# Altium PCB Mini_FPGA_Calculator.PcbDoc
Units mil, origin at the board's own origin, x right, y up, seen from the top; angles counter-clockwise.
Board outline 6000 x 4000 mil, 2 copper layers (Top Layer, Bottom Layer); 45 components, 44 nets, 391 pads, 0 vias.
Unrouted connection lines stored in the file: 67.
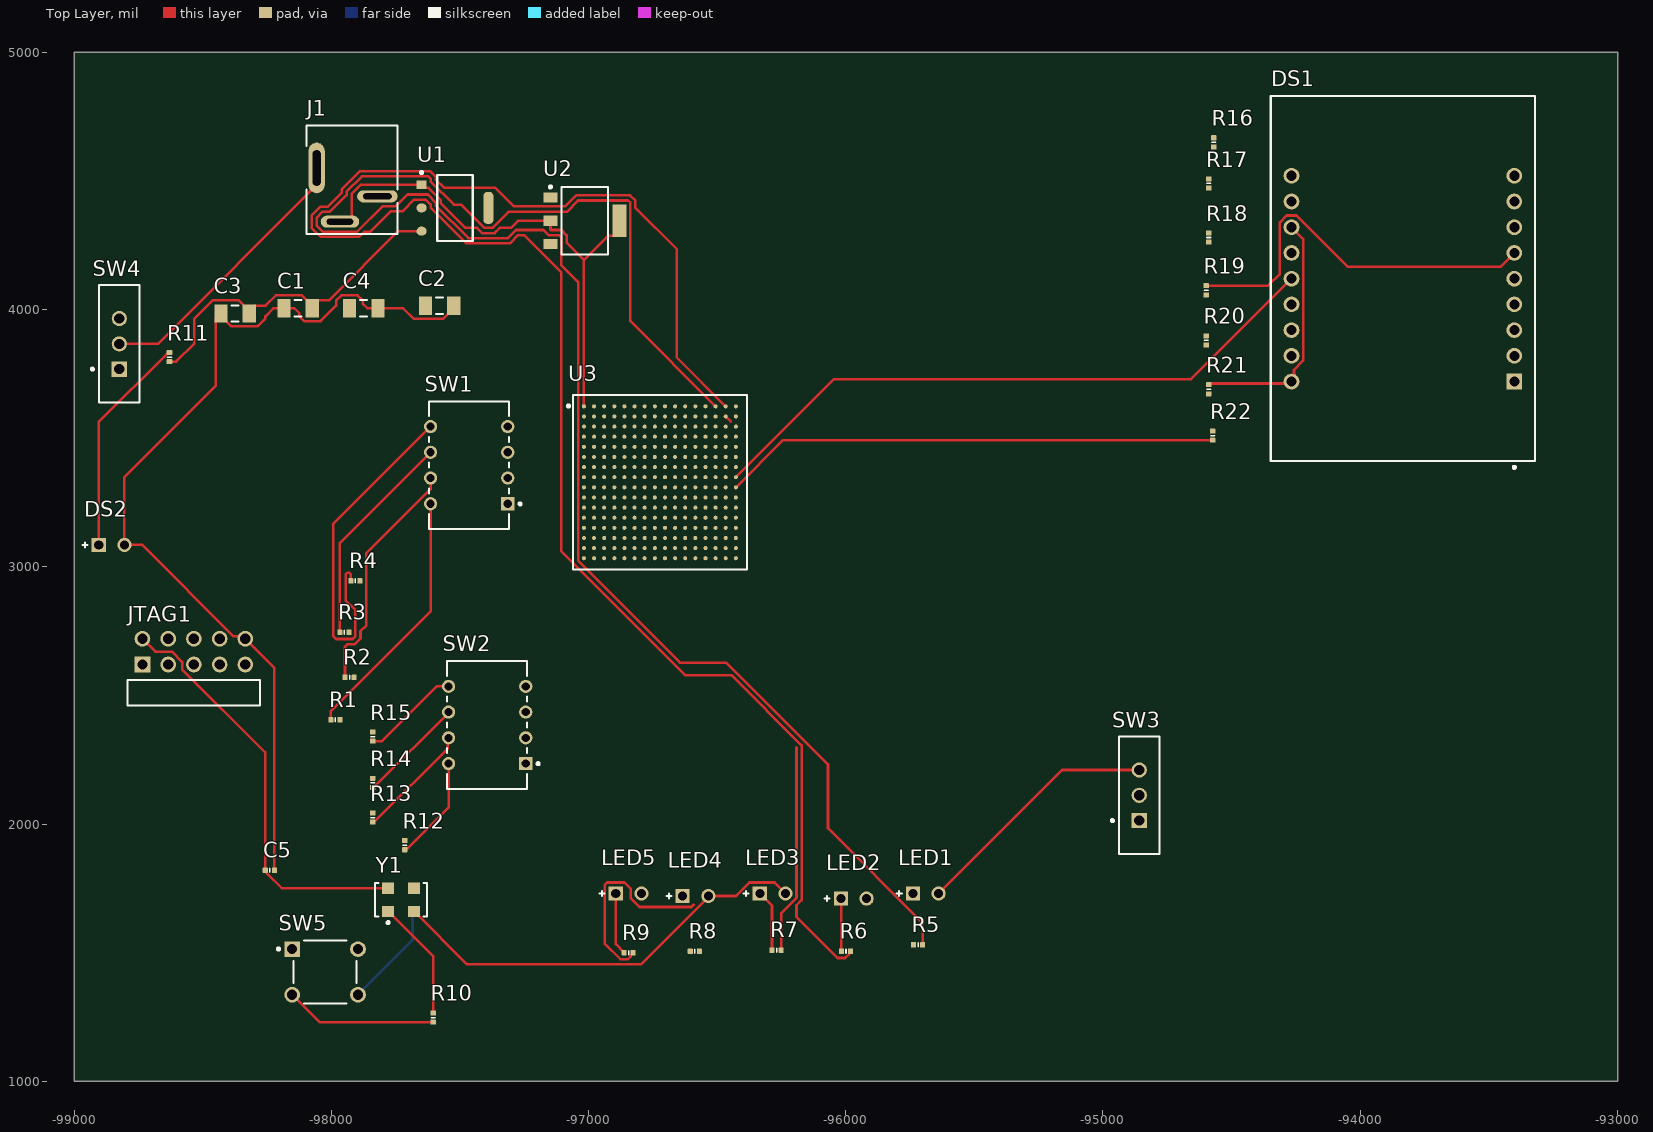
[diagram p0: Top Layer view]
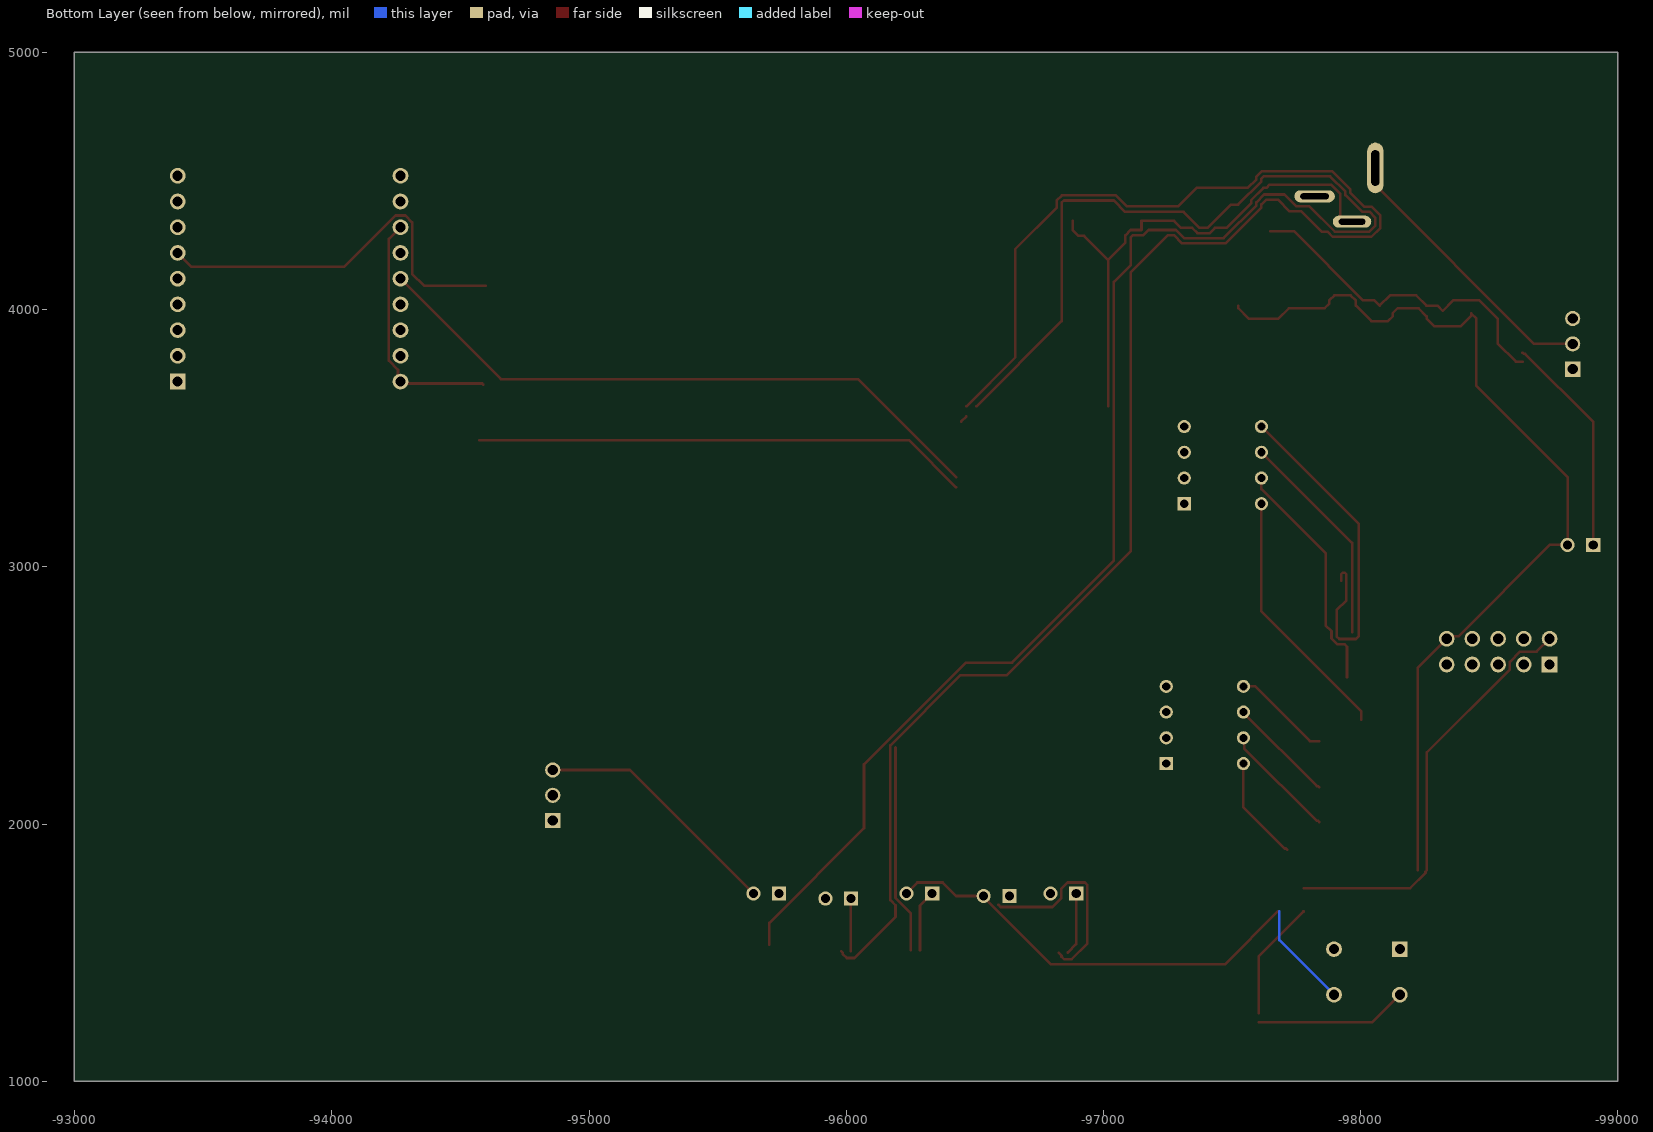
[diagram p1: Bottom Layer view, seen from below]

## Layer stack, top to bottom
Top Solder: solder mask 0.4, Solder Resist, Dk 3.5
Top Layer: signal copper 1.4
Dielectric 1: dielectric 12.6, FR-4, Dk 4.8
Bottom Layer: signal copper 1.4
Bottom Solder: solder mask 0.4, Solder Resist, Dk 3.5

## Board outline
-98999,1000 -92999,1000 -92999,5000 -98999,5000

## Design rules (kind name [scope] priority, off if disabled: settings)
Clearance [All] p1: gap=10 ignorepadtopadclearanceinfootprint=FALSE
PolygonConnect [All] p1: connectstyle=Relief reliefconductorwidth=10 reliefentries=4 polygonreliefangle="90 Angle" airgapwidth=10
RoutingVias [All] p1: holewidth=28 width=50 viastyle="Through Hole" minholewidth=28 minwidth=50 maxholewidth=28 maxwidth=50
SolderMaskExpansion [All] p1: expansion=0 istentingtop=FALSE
SupplyNets "Schematic Supply Nets_4" [InNet('+5V')] p1: voltage=0.000
SupplyNets "Schematic Supply Nets_3" [InNet('GND')] p2: voltage=0.000
SupplyNets "Schematic Supply Nets_1" [InNet('+1.5V')] p3: voltage=0.000
SupplyNets "Schematic Supply Nets" [InNet('+3.3V')] p4: voltage=0.000
Width [All] p1: maxlimit=10 minlimit=10 preferedwidth=10
30 further rules are at their usual default settings.

## Classes and differential pairs
component class User_IO: DS1 LED1 LED2 LED3 LED4 LED5 R1 R2 R3 R4 R5 R6 R7 R8 R9 R12 R13 R14 R15 R16 R17 R18 R19 R20 R21 R22 SW1 SW2 SW3
component class Power: C1 C2 C3 C4 DS2 J1 R11 SW4 U1 U2
component class JTAG_Clock: C5 JTAG1 R10 SW5 Y1
component class FPGA_Core: U3

## Components (designator, comment, footprint, x,y, rotation, side; value= is the part's Value field where it differs from the comment)
C1 "Capacitor 10 uF +/- 10% 16 V 1206" CAPC3216X180X50NL20T25 -98128.88,4005 r0 top value=10µF
C2 "Capacitor 10 uF +/- 10% 16 V 1206" CAPC3216X180X50NL20T25 -97579,4015 r0 top value=10µF
C3 "Capacitor 10 uF +/- 10% 16 V 1206" CAPC3216X180X50NL20T25 -98374,3985 r0 top value=10µF
C4 "Capacitor 10 uF +/- 10% 16 V 1206" CAPC3216X180X50NL20T25 -97874,4005 r0 top value=10µF
C5 "Capacitor 10nF +/-20% 50V 0402" CAPC0402(1005)60_L -98239,1820 r0 top value=10nF
DS1 "DC08-11SRWA" FP-DC08-11SRWA-MFG -93834,4120 r90 top
DS2 "LTL-1CHG" LTST-LTL-1CHG-2 -98854,3085 r0 top
J1 "694106402002" 694106402002 -97919,4505 r0 top
JTAG1 "MTSW-105-09-F-D-383-RA" SMTC-MTSW-105-09-X-D-383-RA -98734,2620 r0 top
LED1 "LTL-1CHG" LTST-LTL-1CHG-2 -95689,1730 r0 top
LED2 "LTL-1CHG" LTST-LTL-1CHG-2 -95969,1710 r0 top
LED3 "LTL-1CHG" LTST-LTL-1CHG-2 -96284,1730 r0 top
LED4 "LTL-1CHG" LTST-LTL-1CHG-2 -96584,1720 r0 top
LED5 "LTL-1CHG" LTST-LTL-1CHG-2 -96844,1730 r0 top
R1 "Resistor 10K  +/-1 % 0402 63 mW" RESC0402(1005)_L -97984,2405 r0 top value=10k
R2 "Resistor 10K  +/-1 % 0402 63 mW" RESC0402(1005)_L -97929,2570 r0 top value=10k
R3 "Resistor 10K  +/-1 % 0402 63 mW" RESC0402(1005)_L -97949,2745 r0 top value=10k
R4 "Resistor 10K  +/-1 % 0402 63 mW" RESC0402(1005)_L -97906.28,2945 r0 top value=10k
R5 "330R2J" RESC0402(1005)_L -95719,1530 r0 top value=330
R6 "330R2J" RESC0402(1005)_L -95999,1505 r0 top value=330
R7 "330R2J" RESC0402(1005)_L -96269,1510 r0 top value=330
R8 "330R2J" RESC0402(1005)_L -96586.72,1505 r0 top value=330
R9 "330R2J" RESC0402(1005)_L -96844,1500 r0 top value=330
R10 "10KR2F" RESC0402(1005)_L -97604,1247.28 r90 top value=10k
R11 "Resistor 330R +/-5 % 0402 63 mW" RESC0402(1005)_L -98629,3815 r90 top value=330
R12 "Resistor 10K  +/-1 % 0402 63 mW" RESC0402(1005)_L -97714,1917.72 r90 top value=10k
R13 "Resistor 10K  +/-1 % 0402 63 mW" RESC0402(1005)_L -97839,2025 r90 top value=10k
R14 "Resistor 10K  +/-1 % 0402 63 mW" RESC0402(1005)_L -97839,2160 r90 top value=10k
R15 "Resistor 10K  +/-1 % 0402 63 mW" RESC0402(1005)_L -97839,2340 r90 top value=10k
R16 "330R2J" RESC0402(1005)_L -94569,4650 r90 top value=330
R17 "330R2J" RESC0402(1005)_L -94589,4490 r90 top value=330
R18 "330R2J" RESC0402(1005)_L -94589,4280 r90 top value=330
R19 "330R2J" RESC0402(1005)_L -94599,4075 r90 top value=330
R20 "330R2J" RESC0402(1005)_L -94599,3880 r90 top value=330
R21 "330R2J" RESC0402(1005)_L -94589,3690 r90 top value=330
R22 "330R2J" RESC0402(1005)_L -94574,3510 r90 top value=330
SW1 "A6TN-4104" FP-A6TN-4104-MFG -97464,3395 r90 top
SW2 "A6TN-4104" FP-A6TN-4104-MFG -97394,2385 r90 top
SW3 "EG1218" ESWI-EG1218_V -94859,2111.57 r90 top
SW4 "EG1218" ESWI-EG1218_V -98824,3866.57 r90 top
SW5 "B3F-1055" FP-B3F-1055-MFG -98024,1425 r0 top
U1 "AMS1117-3.3" FP-AMS1117-IPC_C -97519,4395 r0 top
U2 "LT1963AEST-1.5#TRPBF" LT-ST-3-SOT-223_N -97014,4345 r0 top
U3 "A3P600-FGG256I" FP-FG256-MFG -96722.46,3328.43 r0 top
Y1 "ASFLM1-50.000MHZ-C" FP-ASFLM-MFG -97729,1705 r0 top

## Footprints (in the part's own frame and the unit in brackets; to place one, negate y for a bottom-side part, rotate by r counter-clockwise, add the part's x,y. Pads: shape width x height; smd on the part's side, far side on the other; paste and mask are expansions set on the pad)
694106402002 [mm] "DC Power Jack Vertical THT ?6.4"
  oval 1.6x5 hole 0.8 slot 3.5 at 90 deg: 1(-3.5,1.15)
  oval 3.8x1.2 hole 0.6 slot 2.6 at 0 deg: 2(-1.2,-4.15)
  oval 4x1.2 hole 0.6 slot 2.8 at 0 deg: 3(2.5,-1.65)
  silkscreen extent -4.5,-5.35 4.5,5.35, body extent -4.5,-5.35 4.5,5.35, height 14.1
CAPC0402(1005)60_L [mm] "Chip Capacitor, Body 1.0x0.5mm, Height 0.6mm, IPC High Density"
  rrect25% 0.5x0.55 smd: 1(-0.45,0) 2(0.45,0)
  silkscreen extent 0,-0.2 0,0.2, body extent -0.5,-0.25 0.5,0.25, height 0.6
CAPC3216X180X50NL20T25 [mm] "Chip Capacitor, 2-Leads, Body 3.40x1.80mm, IPC Medium Density"
  rect 1.3x1.8 smd: 1(-1.4,0) 2(1.4,0)
  silkscreen extent -0.35,-0.8 0.35,0.8, body extent -1.7,-0.9 1.7,0.9, height 1.8
ESWI-EG1218_V [mm] "THD, 3-Leads, Body 11.6x4mm, Pitch 2.5mm"
  rect 1.5x1.5 hole 1: 1(-2.5,0)
  round 1.5 hole 1: 2(0,0) 3(2.5,0)
  silkscreen extent -5.8,-2 5.8,2.77, body extent -5.8,-2 5.8,2, height 7.4
FP-A6TN-4104-MFG [mm]
  rect 1.3x1.3 hole 0.8 paste-2539.97 mask+0: 1(-3.81,-3.81)
  round 1.3 hole 0.8 paste-2539.97 mask+0: 2(-1.27,-3.81) 3(1.27,-3.81) 4(3.81,-3.81) 5(3.81,3.81) 6(1.27,3.81) 7(-1.27,3.81) 8(-3.81,3.81)
  silkscreen extent -6.3,-5.16 6.3,3.95, body extent -6.4,-4.56 6.4,4.56, height 0.25
FP-AMS1117-IPC_C [mm]
  rect 1.004x0.872 smd paste+0 mask+0: 1(-3.295,2.29)
  rrect100% 1.004x0.872 smd paste+0 mask+0: 2(-3.295,0) 3(-3.295,-2.29)
  rrect87% 1.004x3.182 smd paste+0 mask+0: 4(3.295,0)
  silkscreen extent -3.42,-3.25 1.75,3.62, body extent -3.9,-3.35 3.9,3.35, height 0.25
FP-ASFLM-MFG [mm]
  rect 1.2x1.1 smd paste+0 mask+0: 1(-1.27,-1.15) 2(1.27,-1.15) 3(1.27,1.15) 4(-1.27,1.15)
  silkscreen extent -2.55,-2.37 2.55,1.65, body extent -2.65,-1.8 2.65,1.8, height 0.25
FP-B3F-1055-MFG [mm]
  rect 1.55x1.55 hole 1 paste-2539.97 mask+0: 1(-3.25,2.25)
  round 1.55 hole 1 paste-2539.97 mask+0: 2(3.25,2.25) 3(-3.25,-2.25) 4(3.25,-2.25)
  silkscreen extent -4.72,-3.1 3.1,3.1, body extent -4.13,-3.2 4.13,3.2, height 0.25
FP-DC08-11SRWA-MFG [mm]
  rect 1.55x1.55 hole 1 paste-2539.97 mask+0: 1(-10.16,-11)
  round 1.55 hole 1 paste-2539.97 mask+0: 2(-7.62,-11) 3(-5.08,-11) 4(-2.54,-11) 5(0,-11) 6(2.54,-11) 7(5.08,-11) 8(7.62,-11) 9(10.16,-11) 10(10.16,11) 11(7.62,11) 12(5.08,11) 13(2.54,11) 14(0,11) 15(-2.54,11) 16(-5.08,11) 17(-7.62,11) 18(-10.16,11)
  silkscreen extent -18.75,-13.05 18.03,13.05, body extent -18.13,-13.15 18.13,13.15, height 0.25
FP-FG256-MFG [mm]
  round 0.4 smd paste+0 mask+0: A1(-7.5,7.5) A2(-6.5,7.5) A3(-5.5,7.5) A4(-4.5,7.5) A5(-3.5,7.5) A6(-2.5,7.5) A7(-1.5,7.5) A8(-0.5,7.5) A9(0.5,7.5) A10(1.5,7.5) A11(2.5,7.5) A12(3.5,7.5) A13(4.5,7.5) A14(5.5,7.5) A15(6.5,7.5) A16(7.5,7.5) B1(-7.5,6.5) B2(-6.5,6.5) B3(-5.5,6.5) B4(-4.5,6.5) B5(-3.5,6.5) B6(-2.5,6.5) B7(-1.5,6.5) B8(-0.5,6.5) B9(0.5,6.5) B10(1.5,6.5) B11(2.5,6.5) B12(3.5,6.5) B13(4.5,6.5) B14(5.5,6.5) B15(6.5,6.5) B16(7.5,6.5) C1(-7.5,5.5) C2(-6.5,5.5) C3(-5.5,5.5) C4(-4.5,5.5) C5(-3.5,5.5) C6(-2.5,5.5) C7(-1.5,5.5) C8(-0.5,5.5) C9(0.5,5.5) C10(1.5,5.5) C11(2.5,5.5) C12(3.5,5.5) C13(4.5,5.5) C14(5.5,5.5) C15(6.5,5.5) C16(7.5,5.5) D1(-7.5,4.5) D2(-6.5,4.5) D3(-5.5,4.5) D4(-4.5,4.5) D5(-3.5,4.5) D6(-2.5,4.5) D7(-1.5,4.5) D8(-0.5,4.5) D9(0.5,4.5) D10(1.5,4.5) D11(2.5,4.5) D12(3.5,4.5) D13(4.5,4.5) D14(5.5,4.5) D15(6.5,4.5) D16(7.5,4.5) E1(-7.5,3.5) E2(-6.5,3.5) E3(-5.5,3.5) E4(-4.5,3.5) E5(-3.5,3.5) E6(-2.5,3.5) E7(-1.5,3.5) E8(-0.5,3.5) E9(0.5,3.5) E10(1.5,3.5) E11(2.5,3.5) E12(3.5,3.5) E13(4.5,3.5) E14(5.5,3.5) E15(6.5,3.5) E16(7.5,3.5) F1(-7.5,2.5) F2(-6.5,2.5) F3(-5.5,2.5) F4(-4.5,2.5) F5(-3.5,2.5) F6(-2.5,2.5) F7(-1.5,2.5) F8(-0.5,2.5) F9(0.5,2.5) F10(1.5,2.5) F11(2.5,2.5) F12(3.5,2.5) F13(4.5,2.5) F14(5.5,2.5) F15(6.5,2.5) F16(7.5,2.5) G1(-7.5,1.5) G2(-6.5,1.5) G3(-5.5,1.5) G4(-4.5,1.5) G5(-3.5,1.5) G6(-2.5,1.5) G7(-1.5,1.5) G8(-0.5,1.5) G9(0.5,1.5) G10(1.5,1.5) G11(2.5,1.5) G12(3.5,1.5) G13(4.5,1.5) G14(5.5,1.5) G15(6.5,1.5) G16(7.5,1.5) H1(-7.5,0.5) H2(-6.5,0.5) H3(-5.5,0.5) H4(-4.5,0.5) H5(-3.5,0.5) H6(-2.5,0.5) H7(-1.5,0.5) H8(-0.5,0.5) H9(0.5,0.5) H10(1.5,0.5) H11(2.5,0.5) H12(3.5,0.5) H13(4.5,0.5) H14(5.5,0.5) H15(6.5,0.5) H16(7.5,0.5) J1(-7.5,-0.5) J2(-6.5,-0.5) J3(-5.5,-0.5) J4(-4.5,-0.5) J5(-3.5,-0.5) J6(-2.5,-0.5) J7(-1.5,-0.5) J8(-0.5,-0.5) J9(0.5,-0.5) J10(1.5,-0.5) J11(2.5,-0.5) J12(3.5,-0.5) J13(4.5,-0.5) J14(5.5,-0.5) J15(6.5,-0.5) J16(7.5,-0.5) K1(-7.5,-1.5) K2(-6.5,-1.5) K3(-5.5,-1.5) K4(-4.5,-1.5) K5(-3.5,-1.5) K6(-2.5,-1.5) K7(-1.5,-1.5) K8(-0.5,-1.5) K9(0.5,-1.5) K10(1.5,-1.5) K11(2.5,-1.5) K12(3.5,-1.5) K13(4.5,-1.5) K14(5.5,-1.5) K15(6.5,-1.5) K16(7.5,-1.5) L1(-7.5,-2.5) L2(-6.5,-2.5) L3(-5.5,-2.5) L4(-4.5,-2.5) L5(-3.5,-2.5) L6(-2.5,-2.5) L7(-1.5,-2.5) L8(-0.5,-2.5) L9(0.5,-2.5) L10(1.5,-2.5) L11(2.5,-2.5) L12(3.5,-2.5) L13(4.5,-2.5) L14(5.5,-2.5) L15(6.5,-2.5) L16(7.5,-2.5) M1(-7.5,-3.5) M2(-6.5,-3.5) M3(-5.5,-3.5) M4(-4.5,-3.5) M5(-3.5,-3.5) M6(-2.5,-3.5) M7(-1.5,-3.5) M8(-0.5,-3.5) M9(0.5,-3.5) M10(1.5,-3.5) M11(2.5,-3.5) M12(3.5,-3.5) M13(4.5,-3.5) M14(5.5,-3.5) M15(6.5,-3.5) M16(7.5,-3.5) N1(-7.5,-4.5) N2(-6.5,-4.5) N3(-5.5,-4.5) N4(-4.5,-4.5) N5(-3.5,-4.5) N6(-2.5,-4.5) N7(-1.5,-4.5) N8(-0.5,-4.5) N9(0.5,-4.5) N10(1.5,-4.5) N11(2.5,-4.5) N12(3.5,-4.5) N13(4.5,-4.5) N14(5.5,-4.5) N15(6.5,-4.5) N16(7.5,-4.5) P1(-7.5,-5.5) P2(-6.5,-5.5) P3(-5.5,-5.5) P4(-4.5,-5.5) P5(-3.5,-5.5) P6(-2.5,-5.5) P7(-1.5,-5.5) P8(-0.5,-5.5) P9(0.5,-5.5) P10(1.5,-5.5) P11(2.5,-5.5) P12(3.5,-5.5) P13(4.5,-5.5) P14(5.5,-5.5) P15(6.5,-5.5) P16(7.5,-5.5) R1(-7.5,-6.5) R2(-6.5,-6.5) R3(-5.5,-6.5) R4(-4.5,-6.5) R5(-3.5,-6.5) R6(-2.5,-6.5) R7(-1.5,-6.5) R8(-0.5,-6.5) R9(0.5,-6.5) R10(1.5,-6.5) R11(2.5,-6.5) R12(3.5,-6.5) R13(4.5,-6.5) R14(5.5,-6.5) R15(6.5,-6.5) R16(7.5,-6.5) T1(-7.5,-7.5) T2(-6.5,-7.5) T3(-5.5,-7.5) T4(-4.5,-7.5) T5(-3.5,-7.5) T6(-2.5,-7.5) T7(-1.5,-7.5) T8(-0.5,-7.5) T9(0.5,-7.5) T10(1.5,-7.5) T11(2.5,-7.5) T12(3.5,-7.5) T13(4.5,-7.5) T14(5.5,-7.5) T15(6.5,-7.5) T16(7.5,-7.5)
  silkscreen extent -9.15,-8.6 8.6,8.6, body extent -9.1,-9.1 9.1,9.1, height 0.25
LT-ST-3-SOT-223_N [mm] "SOT223, 4-Leads, Body 6.505x3.505mm, Pitch 2.3mm, IPC Medium Density"
  rect 1.4x1 smd: 1(-3.4,2.3) 2(-3.4,0) 3(-3.4,-2.3)
  rect 1.4x3.25 smd: 4(3.4,0)
  silkscreen extent -3.52,-3.35 2.3,3.47, body extent -1.86,-3.35 1.86,3.35, height 1.8
LTST-LTL-1CHG-2 [mm] "TH, 2-Leads, Dia 3.8mm"
  rect 1.4x1.4 hole 0.9: 1(-1.27,0)
  round 1.4 hole 0.9: 2(1.27,0)
  silkscreen extent -2.87,-0.25 -2.37,0.25, body extent -1.9,-1.9 1.9,1.9, height 6.5
RESC0402(1005)_L [mm] "Chip Resistor, Body 1.0x0.5mm, IPC High Density"
  rrect25% 0.5x0.55 smd: 1(-0.45,0) 2(0.45,0)
  silkscreen extent 0,-0.2 0,0.2, body extent -0.5,-0.25 0.5,0.25, height 0.3
SMTC-MTSW-105-09-X-D-383-RA [mm] "Assembly .025\" [.64] SQ Post Terminal Strip, 2x5 Pins, Right Angle, 2.54mm Pitch, Male"
  rect 1.55x1.55 hole 1.02: 1(0,0)
  round 1.55 hole 1.02: 2(0,2.54) 3(2.54,0) 4(2.54,2.54) 5(5.08,0) 6(5.08,2.54) 7(7.62,0) 8(7.62,2.54) 9(10.16,0) 10(10.16,2.54)
  silkscreen extent -1.46,-4.06 11.62,-1.52, body extent -1.27,-13.79 11.43,2.86, height 5.59

## Part data
C1 C2 C3 C4: library part CMP-001-00016-6, "Chip Capacitor, 10 uF, +/- 10%, 16 V, 1206 (3216 Metric)", Capacitor Type=Ceramic, Case/Package=1206, Max Operating Temperature=125°C, Min Operating Temperature=-55°C, Tolerance=10%, Voltage Rating=16V, Mounting Technology=SM, Pins=2, RoHS Compliant=True
C5: library part CMP-001-00069-3, "Chip Capacitor, 10nF +/-20%, 50V, 0402, Thickness 0.6 mm", Case/Package=0402, Max Operating Temperature=85°C, Min Operating Temperature=-55°C, Tolerance=5%, Voltage Rating=50V, Mounting Technology=SMT, Pins=2
DS1: library part CMP-00030-00004-1, "7 Seg Numeric LED Display, 2-Character, Super Bright Red, 20.32mm", Case/Package=DIP, Max Operating Temperature=85°C, Min Operating Temperature=-40°C
DS2 LED1 LED2 LED3 LED4 LED5: library part CMP-007-00019-2, "LED Uni-Color Green, 100 mW, 30 mA, -55 to 100 degC, 2-Pin THD, RoHS, Bulk", Case/Package=Radial, Colour=Green, Forward Current=30mA, Forward Voltage=2.6V, Manufacturer=Lite-On, Max Operating Temperature=100°C, Min Operating Temperature=-55°C, Package Description="2-Pin Through Hole Device, Dia 3.8 mm", Package Quantity=1000, Power=100mW, Datasheet URL=http://datasheet.octopart.com/LTL-1CHG-Lite-On-datasheet-143841.pdf, Datasheet Version=Mar-00, Illumination Colour=Green, Lens Style=Dome, Luminous Intensity=12.6mcd, Manufacturer URL=http://www.us.liteon.com/, Mounting Technology=TH, Nominal Vf=2.1V, Package Reference=LTL-1CHG, Packaging=Bulk, Pins=2, RoHS Compliant=True, Viewing Angle=60degrees
J1: library part CMP-1502-00189-3, "DC Power Jack Connector WR-DC, Male, Vertical, THT, 3 A, 20 V", Color=Black, Current Rating=3A, Flammability Rating="UL94 V-0", Insulation Resistance=100MΩ, Max Operating Temperature=85°C, Min Operating Temperature=-40°C, Operating Supply Voltage=20V, Voltage Rating=30V, Connector Type=Power, Contact Gender=Female, Contact Material=Gold, Contact Plating=Tin, Gender=Male, Height=14.3mm, Housing Material=Polyamide, Mount="Through Hole", Number of Contacts=1, Orientation=Vertical, Packaging=Bulk, REACH SVHC=Unknown, RoHS=Compliant, Shielding=Unshielded, Termination="Through Hole", Voltage Rating (DC)=20V
JTAG1: library part CMP-002-00071-1, "Pin Header, Board-to-Board, 2 Rows, 10 Contacts, Through Hole, MTSW Series, Unshrouded, Horizontal", Max Operating Temperature=125°C, Min Operating Temperature=-55°C, Pins=10
R1 R2 R3 R4 R12 R13 R14 R15: library part CMP-009-00149-3, "Chip Resistor, 10 kOhms, +/-1 %, 63 mW, -55 to 125 degC, 0402", Case/Package=0402, Max Operating Temperature=155°C, Min Operating Temperature=-55°C, Power=63mW, Tolerance=1%, Pins=2
R5 R6 R7 R8 R9 R16 R17 R18 R19 R20 R21 R22: library part CMP-009-00095-2, "330R 0.063W 5% 0402 (1005 Metric)  SMD", Case/Package=0402, Power=63mW, Tolerance=5%, Mounting Technology=SMT, Pins=2
R10: library part CMP-009-00066-2, "10K 0.063W 1% 0402 (1005 Metric)  SMD", Case/Package=0402, Power=63mW, Tolerance=1%, Mounting Technology=SMT, Pins=2
R11: library part CMP-009-00132-3, "Chip Resistor, 330 Ohms, +/-5 %, 63 mW, -55 to 155 degC, 0402", Case/Package=0402, Max Operating Temperature=155°C, Min Operating Temperature=-55°C, Power=63mW, Tolerance=5%, Pins=2
SW1 SW2: library part CMP-08827-000057-1, "SWITCH SLIDE DIP SPST 25MA 24V", Contact Resistance=200mR, Current Rating=25mA, Max Operating Temperature=85°C, Max Voltage Rating (DC)=24V, Min Operating Temperature=-30°C, Package Quantity=35, Actuator Length=1mm, Actuator Type="Slide (Standard)", Electrical Life=1000Cycles, Length=0.476inch, Max Current Rating=25mA, Mount="Through Hole", Number of Circuits=4, Number of Positions=4, Orientation=Straight, Packaging=Rail/Tube, Pitch=0.1inch, RoHS Compliant=Yes, Series=A6TN, Terminal Pitch=2.54mm, Termination="PC Pins", Throw Configuration=SPST, Voltage Rating (DC)=24V, Washable=Yes, Weight=0.58g
SW3: library part CMP-011-00006-2, "Slide Switch, SPDT, 500 V, -20 to 70 degC, 3-Pin THD, RoHS, Bulk", Contact Current Rating=200mA, Manufacturer=E-Switch, Max Operating Temperature=70°C, Min Operating Temperature=-20°C, Operating Force=250gf, Package Description="3-Pin Through Hole Device, Body 11.6 x 4 mm, Pitch 2.5 mm", Package Quantity=1000, Voltage Rating (AC)=30V, Case/Package=EG1218, Contact Finish=Silver, Contact Material=Copper, Contact Plating=Silver, Current Rating=200mA, Datasheet URL=https://www.e-switch.com/system/asset/product_line/data_sheet/119/EG.pdf, Datasheet Version=Oct-15, Manufacturer URL=http://www.e-switch.ch/en/, Mounting Technology=TH, Package Reference=EG1218, Packaging=Bulk, Pins=3, RoHS Compliant=True, Throw Configuration=SPDT, Voltage Rating (DC)=30V
SW4: library part CMP-1696-00002-1, "Slide Switch, 500 V, -20 to 70 degC, 3-Pin THD, RoHS", Case\Package=SOT-23-5, Dropout Voltage="300 mV", Max Input Voltage="8 V", Max Operating Temperature="85 degC", Max Ouput Current="150 mA", Max Power Dissipation="250 mW", Min Input Voltage="4.3 V", Min Operating Temperature="-40 degC", Nominal Output Voltage="3.3 V", Package Quantity=3000, ComponentLink1Description="Manufacturer URL", ComponentLink1URL=http://www.e-switch.ch/en/, ComponentLink2Description=Datasheet, ComponentLink2URL=https://www.e-switch.com/system/asset/product_line/data_sheet/119/EG.pdf, DatasheetVersion=Oct-15, Height="1.3 mm", Length="3 mm", Mount="Surface Mount", Output Current="150 mA", Output Voltage="3.3 V", Outputs=1, PackageDescription="3-Pin Through Hole Device, Body 11.6 x 4 mm, Pitch 2.5 mm", PackageReference=EG1218, Packaging="Tape and Reel", Pins=5, Power Rating="250 mW", Radiation Hardening=No, REACH SVHC="No SVHC", RoHSCompliant=true, Width="1.8 mm"
SW5: library part CMP-08834-000061-1, "SWITCH TACTILE SPST-NO 0.05A 24V", Actuator Color=Orange, Contact Current Rating=50mA, Contact Resistance=100mR, Max Operating Temperature=70°C, Max Voltage Rating (DC)=24V, Min Operating Temperature=-25°C, Operating Force=2.55N, Package Quantity=1500, Actuator Length=3mm, Contact Material=Gold, Contact Plating=Silver, Contact Type="1 maker", Current Rating=50mA, Depth=6mm, Electrical Life=300000Cycles, Height=7.3mm, Illumination Type=Non-Illuminated, Lead Free="Lead Free", Length=6mm, Max Current Rating=50mA, Mechanical Life=100000Cycles, Mount="Through Hole", Number of Poles=1, Orientation=Straight, Packaging=Bag, RoHS Compliant=Yes, Series=B3F, Switch Function=Off-Mom, Switch Travel=0.25mm, Termination="PC Pins", Throw Configuration=SPST, Voltage Rating (DC)=24V, Weight=0.25g, Width=6mm
U1: library part CMP-209535-000001-1, "LDO Voltage Regulators 1A, 3.3V", Dropout Voltage=1.1V, Manufacturer="Advanced Monolithic Systems", Max Junction Temp=+125°C, Max Power Dissipation=1.2W, Max Supply Voltage=15V, Nominal Supply Current=5mA, Output Current=1A, Output Voltage=3.3V, Package=AMS1117, Temperature="-40°C to +125°C", Temperature Range Low=-40°C, Automotive=No, Category=IC, ComponentLink2Description=Datasheet, ComponentLink2URL=http://www.advanced-monolithic.com/pdf/ds1117.pdf, Device Class L1="Integrated Circuits (ICs)", Device Class L2="Power Management ICs", Device Class L3="Voltage Regulators - Linear", Height=1.8mm, Ipc Land Pattern Name=SOT229P700X180-4, Lead Free=Yes, Manufacturer Part Number=AMS1117-3.3, Number Of Outputs=1, Octopart=https://octopart.com/ams1117-3.3-advanced+monolithic+systems-25899300, Output Type=Fixed, RoHS=TRUE, Standoff Height=0.64mm, Temperature Range High=+125°C
U2: library part CMP-0476-01777-1, "1.5 A, Low Noise, Fast Transient Response LDO Regulator, 2.1 to 20 V Vin, 1.5 V Vout, 3-pin SOT223 (ST-3), -40 to 125 degC, Pb-Free, Tape and Reel", Dropout Voltage(V)=0.34, Manufacturer="Linear Technology", Output Voltage="1.5 V", Shutdown Current(uA)=0.01, ComponentLink1Description="Manufacturer URL", ComponentLink1URL=http://www.linear.com/, ComponentLink2Description=Datasheet, ComponentLink2URL=http://cds.linear.com/docs/en/datasheet/1963afe.pdf, ComponentLink3Description="Package Specification", ComponentLink3URL=http://cds.linear.com/docs/en/packaging/SOT_3_05-08-1630.pdf, DatasheetVersion="Rev. E", Discrete Pass Element=no, Iout(mA)=1500, Isupply(mA)=1, Mounting Technology="Surface Mount", Noise(uV)=40, Number Of Outputs=1, PackageDescription="3-Pin Plastic SOT-223, 3.505 x 6.505 mm Body, Pitch 2.3 mm", PackageReference=ST-3, PackageVersion=Jun-10, Packing="Tape and Reel", PartNumber=LT1963AEST-1.5#TRPBF, PSRR(dB)=63, RoHS=TRUE, Vin Max(V)=20, Vin Min(V)=2.1
U3: library part CMP-00252-99164184-1, "A3P600-FGG256I FPGA ProASIC®3 Family 600K Gates 231MHz 130nm (CMOS) Technology 1.5V 256-Pin FBGA", Case/Package=FBGA, Frequency=231MHz, Max Junction Temperature (Tj)=100°C, Max Operating Temperature=85°C, Max Supply Voltage=1.575V, Min Operating Temperature=-40°C, Min Supply Voltage=1.4V, Nominal Supply Current=5mA, Operating Supply Current=45mA, Operating Supply Voltage=1.5V, Height=1.2mm, Lead Free="Lead Free", Length=17mm, Lifecycle Status=Production, Max Frequency=231MHz, Memory Size=13.5kB, Memory Type=RAM, Mount="Surface Mount", NexarPartId=99164184, Number of Gates=600000, Number of I/Os=177, Number of Logic Blocks (LABs)=24, Number of Logic Elements/Cells=6500, Number of Pins=256, Number of Registers=13824, Radiation Hardening=No, RAM Size=13.5kB, RoHS=Compliant, Width=17mm
Y1: library part CMP-27762-000850-1, "MEMS Oscillator 50MHz ±50ppm LVCMOS 3.0V 4-SMD 5mm x 3.2mm", Case/Package=QFN, Frequency=50MHz, Frequency Stability=50ppm, Load Capacitance=15pF, Packaging=Rail/Tube, Radiation Hardening=No, RoHS Compliant=Yes

## Nets (pads, with @x,y where several pads share a name; then routed paths per layer and width w, separated by ;. In a path a pad name is that pad's centre, name@x,y a point inside that pad or via, vN(x,y) a via of type N, cw(c..) or ccw(c..) an arc to the next point about the centre after c; other vN are vias at no path point)
" CARRY": R9.2 U3.A13 | length 791.4
  Top Layer w10: R9.2 -96826.28,1499.02 -96836.87,1488.43 -96836.87,1484.4 -96847.1,1474.17 -96876.33,1474.17 -96936.56,1534.4 -96936.56,1763.77 -96927.77,1772.56 -96860.23,1772.56 -96836.56,1748.89 -96836.56,1712.37 -96801.63,1677.44 -96600.23,1677.44 -96591.44,1686.23
+1.5V: U3.J3
+3.3V: C5.1 JTAG1.2 R10.2 Y1.1 Y1.4 | length 2113.3
  Top Layer w10: JTAG1.2 -98684.06,2670.06 -98619.69,2670.06 -98579.51,2629.88 -98579.51,2601.15 -98256.72,2278.35 C5.1 -98251.87,1815.16 -98251.87,1810.15 -98192,1750.28 Y1.4 ; Y1.1 -97777.03,1659.72 -97604,1486.69 R10.2
+5V: C1.2 C3.2 R11.1 SW4.1 U1.3 U2.1 | length 1313.9
  Top Layer w10: R11.1 -98603.17,3797.28 -98532.05,3868.41 -98532.05,3964.31 -98460.92,4035.43 -98359.47,4035.43 -98318.88,3994.84 -98298.29,4015.43 -98255.8,4015.43 -98215.8,4055.43 -98114.35,4055.43 -98073.76,4014.84 -98053.17,4035.43 -98009.21,4035.43 -97739.8,4304.84 U1.3
A0: R1.1 SW1.8 U3.A2 | length 1000.6
  Top Layer w10: R1.1 -98001.72,2439.13 -97614,2826.84 SW1.8
A1: R2.1 SW1.7 U3.A3 | length 929.4
  Top Layer w10: R2.1 -97946.72,2689.13 -97936.67,2699.17 -97908.38,2699.17 -97886.44,2721.12 -97886.44,2749.4 -97863.72,2772.12 -97863.72,3052.68 -97614,3302.4 SW1.7
A2: R3.1 SW1.6 U3.B2 | length 846.1
  Top Layer w10: R3.1 -97966.72,3092.28 SW1.6
A3: R4.1 SW1.5 U3.A4 | length 1373.2
  Top Layer w10: R4.1 -97924,2970.83 -97929.86,2976.68 -97938.14,2976.68 -97944,2970.83 -97944,2868.89 -97906.44,2831.33 -97906.44,2729.4 -97916.67,2719.17 -97981.33,2719.17 -97991.56,2729.4 -97991.56,3167.44 SW1.5
ADD_SUB: SW3.2
B0: R12.1 SW2.8 U3.B4 | length 408.3
  Top Layer w10: R12.1 -97709.16,1904.84 -97704.15,1904.84 -97544,2064.99 SW2.8
B1: R13.1 SW2.7 U3.B1 | length 452.8
  Top Layer w10: R13.1 -97834.16,2012.13 -97829.15,2012.13 -97546.87,2294.41 -97546.87,2332.13 SW2.7
B2: R14.1 SW2.6 U3.C5 | length 417.8
  Top Layer w10: R14.1 -97834.16,2147.13 -97829.15,2147.13 -97544,2432.28 SW2.6
B3: R15.1 SW2.5 U3.C6 | length 383.1
  Top Layer w10: R15.1 -97802.94,2322.28 -97590.22,2535 SW2.5
CLK_50MHZ: Y1.3
DIGIT1: DS1.14 U3.H16 | length 2479.8
  Top Layer w10: U3.H16 -96045.58,3729.72 -94657.35,3729.72 DS1.14
DIGIT2: DS1.13 U3.H13
GND: C1.1 C2.2 C3.1 C4.2 C5.2 DS2.2 J1.2 JTAG1.10 LED1.2 LED2.2 LED3.2 LED4.2 SW1.1 SW1.2 SW1.3 SW1.4 SW2.1 SW2.2 SW2.3 SW2.4 SW3.3 SW5.4 U1.1 U2.2 U2.4 U3.A1 U3.A16 U3.F6 U3.F11 U3.G7 U3.G8 U3.G9 U3.G10 U3.H4 U3.H7 U3.H8 U3.H9 U3.H10 U3.J7 U3.J8 U3.J9 U3.J10 U3.K7 Y1.2 | length 8871.8
  Top Layer w10: C5.2 -98221.28,2607.28 JTAG1.10 -98343.76,2729.76 -98379.4,2729.76 -98734.64,3085 DS2.2 -98804,3348.74 -98449.71,3703.03 -98449.71,3964.41 C3.1 -98429.12,3975.16 -98388.53,3934.57 -98287.08,3934.57 -98255.83,3965.81 -98255.83,3973.76 -98224.59,4005 C1.1 -98143.41,4005 -98124.49,3986.08 -98124.49,3973.49 -98105.57,3954.57 -98041.96,3954.57 -97981.3,4015.22 -97981.3,4035.05 -97960.92,4055.43 -97897.31,4055.43 -97878.39,4036.51 -97878.39,4023.92 -97859.47,4005 C4.2 -97720.52,4005 -97680.09,3964.57 -97564.47,3964.57 -97523.88,4005.16 C2.2 ; J1.2 -97937.27,4341.61 -97920.06,4358.82 -97920.06,4450.29 -97885.19,4485.16 -97646.12,4485.16 -97633.95,4472.99 -97622.05,4472.99 -97573.95,4424.89 -97573.95,4412.99 -97478.32,4317.36 -97433.47,4317.36 -97413.47,4297.36 -97365.08,4297.36 -97345.08,4317.36 -97301.62,4317.36 -97273.98,4345 U2.2 -97147.86,4310.31 -97146.68,4309.13 -97105.8,4309.13 -97085.3,4288.63 -97085.3,4260.35 -97017.74,4192.79 ; Y1.2 -97677.03,1659.72 -97471.48,1454.17 -96795.21,1454.17 -96534,1715.39 LED4.2 -96427.29,1720 -96374.73,1772.56 -96276.56,1772.56 LED3.2 ; U3.A1 -97017.74,4192.79 ; U2.4 -96880.14,4308.58 -96902.7,4286.02 -96924.5,4286.02 -97017.74,4192.79 ; LED1.2 -95159,2210 SW3.3
  Bottom Layer w10: SW5.4 -97684,1548.46 -97684,1660
NetDS2_1: DS2.1 R11.2 | length 864.6
  Top Layer w10: DS2.1 -98904,3562.72 -98638.85,3827.87 -98633.84,3827.87 R11.2
NetJ1_1: J1.1 SW4.2 | length 1089.6
  Top Layer w10: SW4.2 -98673.57,3866.57 -98056.8,4483.35 J1.1
NetLED1_1: LED1.1 R5.1
NetLED2_1: LED2.1 R6.1 | length 205.9
  Top Layer w10: LED2.1 -96016.72,1707.72 R6.1
NetLED3_1: LED3.1 R7.1 | length 239.6
  Top Layer w10: LED3.1 -96286.72,1682.72 R7.1
NetLED4_1: LED4.1 R8.1
NetLED5_1: LED5.1 R9.1 | length 243.4
  Top Layer w10: LED5.1 -96894,1533.27 -96861.72,1500.98 R9.1
NetU3_F7: U3.F7 U3.F8 U3.F9 U3.F10 U3.G6 U3.G11 U3.H6 U3.H11 U3.J6 U3.J11 U3.K6 U3.K11 U3.L7 U3.L8 U3.L9 U3.L10
NetU3_G13: U3.G13
NetU3_H12: U3.H12
RESET_N: R10.1 SW5.3 | length 592.2
  Top Layer w10: SW5.3 -98045.1,1229.57 R10.1
RESULT0: R5.2 U3.A14 | length 6949.4
  Top Layer w10: U3.A14 -96837.58,3955.35 -96837.58,4415.19 -96846.37,4423.98 -97040,4423.98 -97084.29,4379.69 -97311.04,4379.69 -97373.37,4317.36 -97405.18,4317.36 -97495.43,4407.6 -97523.71,4407.6 -97613.95,4497.85 -97613.95,4508.54 -97622.74,4517.33 -97881.31,4517.33 -97940.06,4458.57 -97940.06,4445.31 -98005.14,4380.24 -98033.42,4380.24 -98056.05,4357.61 -98056.05,4325.62 -98033.42,4302.99 -97899.07,4302.99 -97800.64,4401.42 -97749.46,4401.42 -97703.71,4447.17 -97624.51,4447.17 -97593.95,4416.61 -97593.95,4404.71 -97466.61,4277.36 -97313.34,4277.36 -97281.56,4309.13 -97174.96,4309.13 -97154.96,4289.13 -97114.09,4289.13 -97105.3,4280.35 -97105.3,4171.72 -97040.61,4107.03 -97040.61,3023.67 -96644.5,2627.56 -96464.99,2627.56 -96068.88,2231.45 -96068.88,1983.55 -95701.28,1615.95 R5.2
RESULT1: R6.2 U3.A15 | length 6910.1
  Top Layer w10: U3.A15 -96657.01,3814.16 -96657.01,4234.62 -96817.58,4395.19 -96817.58,4423.47 -96838.09,4443.98 -97048.28,4443.98 -97091.39,4400.87 -97290.04,4400.87 -97361.82,4472.64 -97560.46,4472.64 -97593.95,4506.13 -97593.95,4516.82 -97614.46,4537.33 -97889.6,4537.33 -97960.06,4466.86 -97960.06,4453.6 -98013.42,4400.24 -98041.71,4400.24 -98076.05,4365.9 -98076.05,4317.33 -98041.71,4282.99 -97890.78,4282.99 -97870.78,4302.99 -97847.88,4302.99 -97769.46,4381.42 -97724,4381.42 -97678.25,4427.17 -97632.8,4427.17 -97613.95,4408.32 -97613.95,4396.42 -97474.89,4257.36 -97305.05,4257.36 -97273.28,4289.13 -97251,4289.13 -97105.3,4143.43 -97105.3,3060.08 -96624.27,2579.05 -96444.77,2579.05 -96171.44,2305.72 -96171.44,1704.09 -96191.44,1684.09 -96191.44,1639.28 -96031.33,1479.17 -96002.1,1479.17 -95986.13,1495.15 -95986.13,1500.16 R6.2
RESULT2: R7.2 U3.B15 | length 840.1
  Top Layer w10: U3.B15 -96446.87,3564.65 ; R7.2 -96251.28,1652.53 -96191.44,1712.37 -96191.44,2297.44
RESULT3: R8.2 U3.B13
SEG_A: R16.1 U3.D14
SEG_B: R17.1 U3.C12
SEG_C: R18.1 U3.B12
SEG_D: DS1.2 DS1.6 R19.2 | length 1533.6
  Top Layer w10: R19.2 -94358.72,4092.72 -94312.58,4138.85 -94312.58,4338.85 -94285.92,4365.51 -94248.22,4365.51 -94048.22,4165.51 -93455.42,4165.51 DS1.6
SEG_E: R20.1 U3.H14
SEG_F: DS1.12 DS1.18 R21.2 | length 964.7
  Top Layer w10: R21.2 -94584.16,3712.56 -94274.51,3712.56 DS1.18 -94257.31,3729.76 -94257.31,3765.4 -94221.56,3801.15 -94221.56,4274.49 DS1.12
SEG_G: R22.1 U3.J16 | length 1929.2
  Top Layer w10: U3.J16 -96243.65,3492.28 R22.1
TCK: U3.P13
TDI: U3.R14
TDO: U3.R16
TMS: U3.T15
TRST: U3.P15
pads on no net: C2.1 C4.1 DS1.1 DS1.3 DS1.4 DS1.5 DS1.7 DS1.8 DS1.9 DS1.10 DS1.11 DS1.15 DS1.16 DS1.17 J1.3 JTAG1.1 JTAG1.3 JTAG1.4 JTAG1.5 JTAG1.6 JTAG1.7 JTAG1.8 JTAG1.9 LED5.2 R1.2 R2.2 R3.2 R4.2 R12.2 R13.2 R14.2 R15.2 R16.2 R17.2 R18.2 R19.1 R20.2 R21.1 R22.2 SW3.1 SW4.3 SW5.1 SW5.2 U1.2 U1.4 U2.3 U3.A5 U3.A6 U3.A7 U3.A8 U3.A9 U3.A10 U3.A11 U3.A12 U3.B3 U3.B5 U3.B6 U3.B7 U3.B8 U3.B9 U3.B10 U3.B11 U3.B14 U3.B16 U3.C1 U3.C2 U3.C3 U3.C4 U3.C7 U3.C8 U3.C9 U3.C10 U3.C11 U3.C13 U3.C14 U3.C15 U3.C16 U3.D1 U3.D2 U3.D3 U3.D4 U3.D5 U3.D6 U3.D7 U3.D8 U3.D9 U3.D10 U3.D11 U3.D12 U3.D13 U3.D15 U3.D16 U3.E1 U3.E2 U3.E3 U3.E4 U3.E5 U3.E6 U3.E7 U3.E8 U3.E9 U3.E10 U3.E11 U3.E12 U3.E13 U3.E14 U3.E15 U3.E16 U3.F1 U3.F2 U3.F3 U3.F4 U3.F5 U3.F12 U3.F13 U3.F14 U3.F15 U3.F16 U3.G1 U3.G2 U3.G3 U3.G4 U3.G5 U3.G12 U3.G14 U3.G15 U3.G16 U3.H1 U3.H2 U3.H3 U3.H5 U3.H15 U3.J1 U3.J2 U3.J4 U3.J5 U3.J12 U3.J13 U3.J14 U3.J15 U3.K1 U3.K2 U3.K3 U3.K4 U3.K5 U3.K8 U3.K9 U3.K10 U3.K12 U3.K13 U3.K14 U3.K15 U3.K16 U3.L1 U3.L2 U3.L3 U3.L4 U3.L5 U3.L6 U3.L11 U3.L12 U3.L13 U3.L14 U3.L15 U3.L16 U3.M1 U3.M2 U3.M3 U3.M4 U3.M5 U3.M6 U3.M7 U3.M8 U3.M9 U3.M10 U3.M11 U3.M12 U3.M13 U3.M14 U3.M15 U3.M16 U3.N1 U3.N2 U3.N3 U3.N4 U3.N5 U3.N6 U3.N7 U3.N8 U3.N9 U3.N10 U3.N11 U3.N12 U3.N13 U3.N14 U3.N15 U3.N16 U3.P1 U3.P2 U3.P3 U3.P4 U3.P5 U3.P6 U3.P7 U3.P8 U3.P9 U3.P10 U3.P11 U3.P12 U3.P14 U3.P16 U3.R1 U3.R2 U3.R3 U3.R4 U3.R5 U3.R6 U3.R7 U3.R8 U3.R9 U3.R10 U3.R11 U3.R12 U3.R13 U3.R15 U3.T1 U3.T2 U3.T3 U3.T4 U3.T5 U3.T6 U3.T7 U3.T8 U3.T9 U3.T10 U3.T11 U3.T12 U3.T13 U3.T14 U3.T16